# Altium PCB buck_conv.PcbDoc
Units mil, origin at the board's own origin, x right, y up, seen from the top; angles counter-clockwise.
Board outline 2370 x 1275 mil, 4 copper layers (Top Layer, MidLayer1, MidLayer2, Bottom Layer); 33 components, 22 nets, 92 pads, 277 vias.
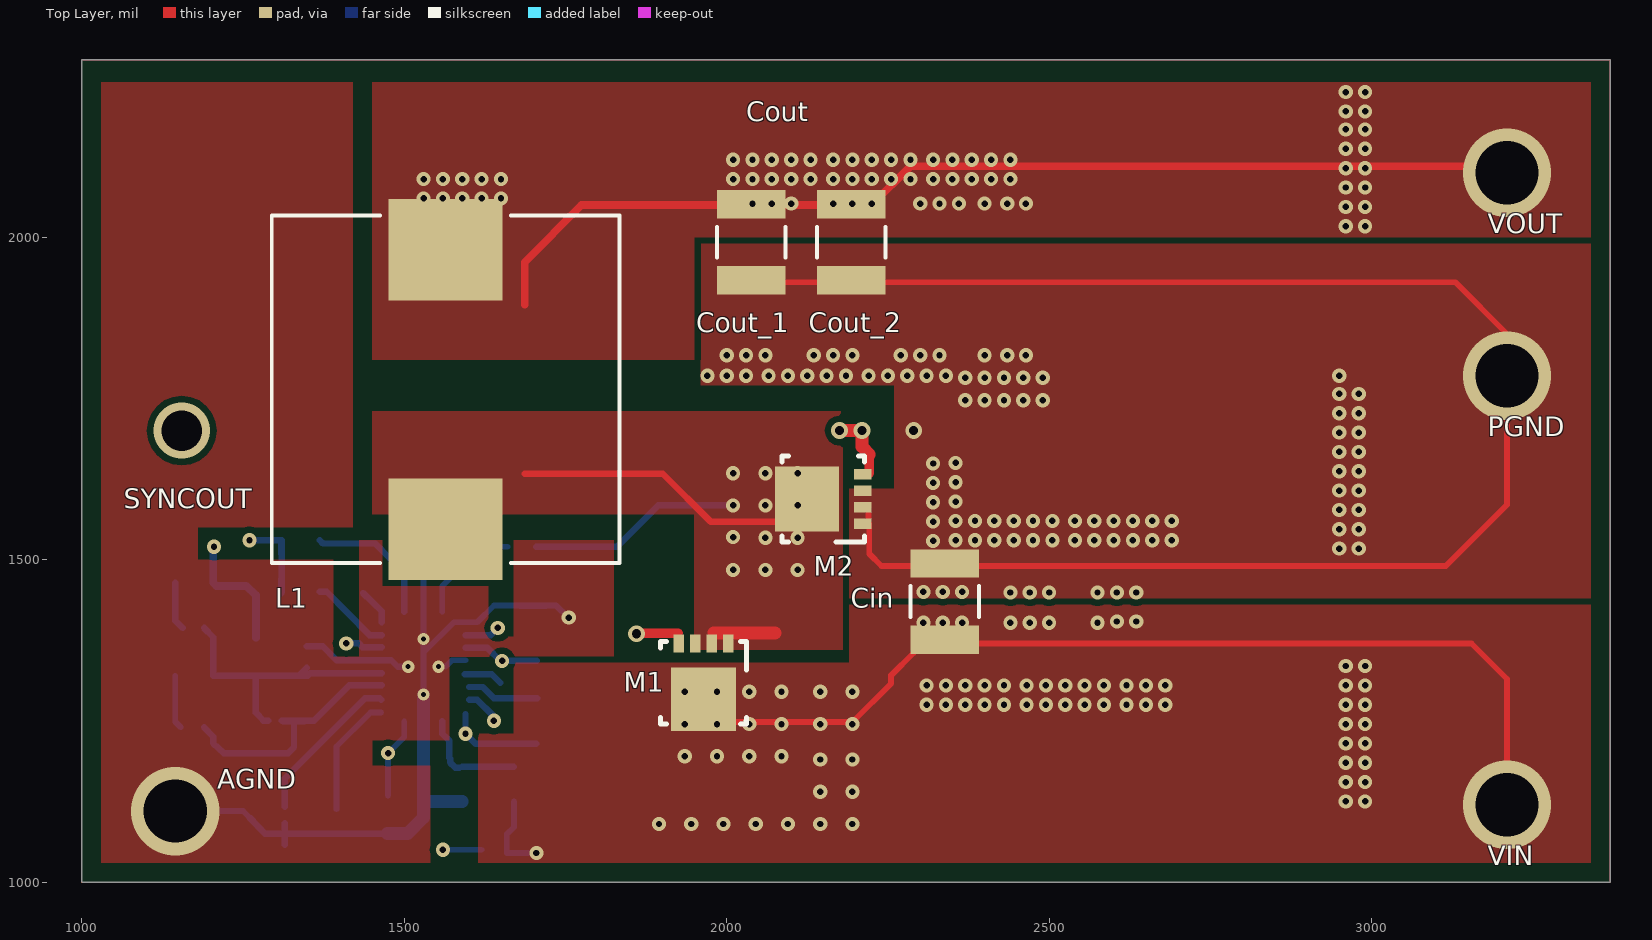
[diagram p0: Top Layer view]
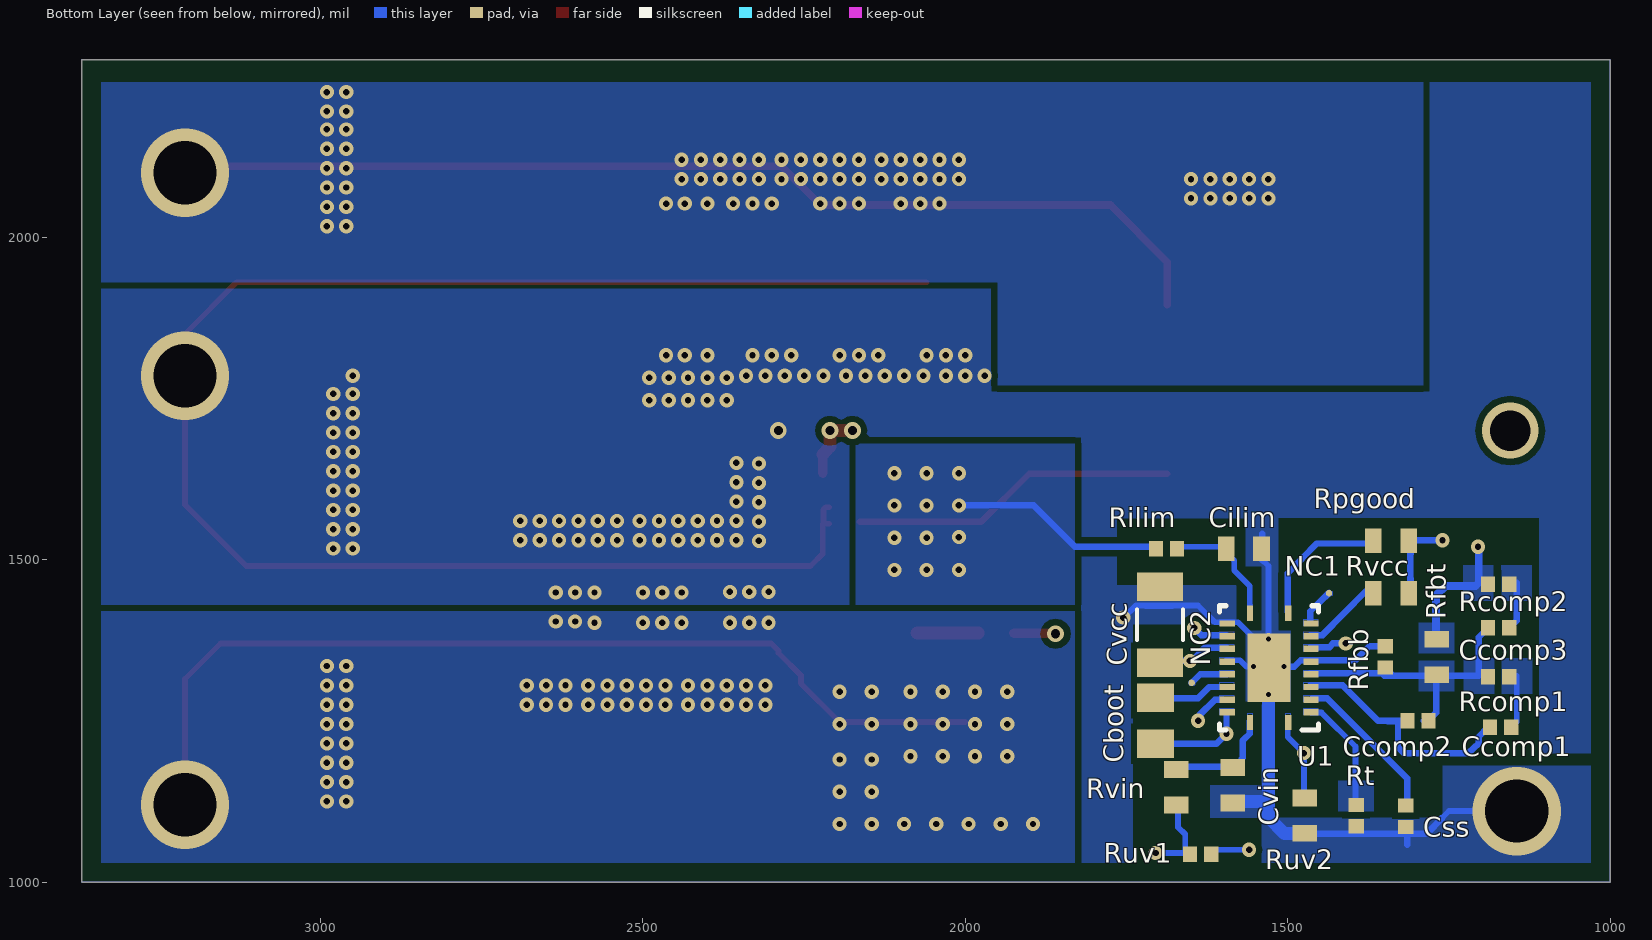
[diagram p1: Bottom Layer view, seen from below]
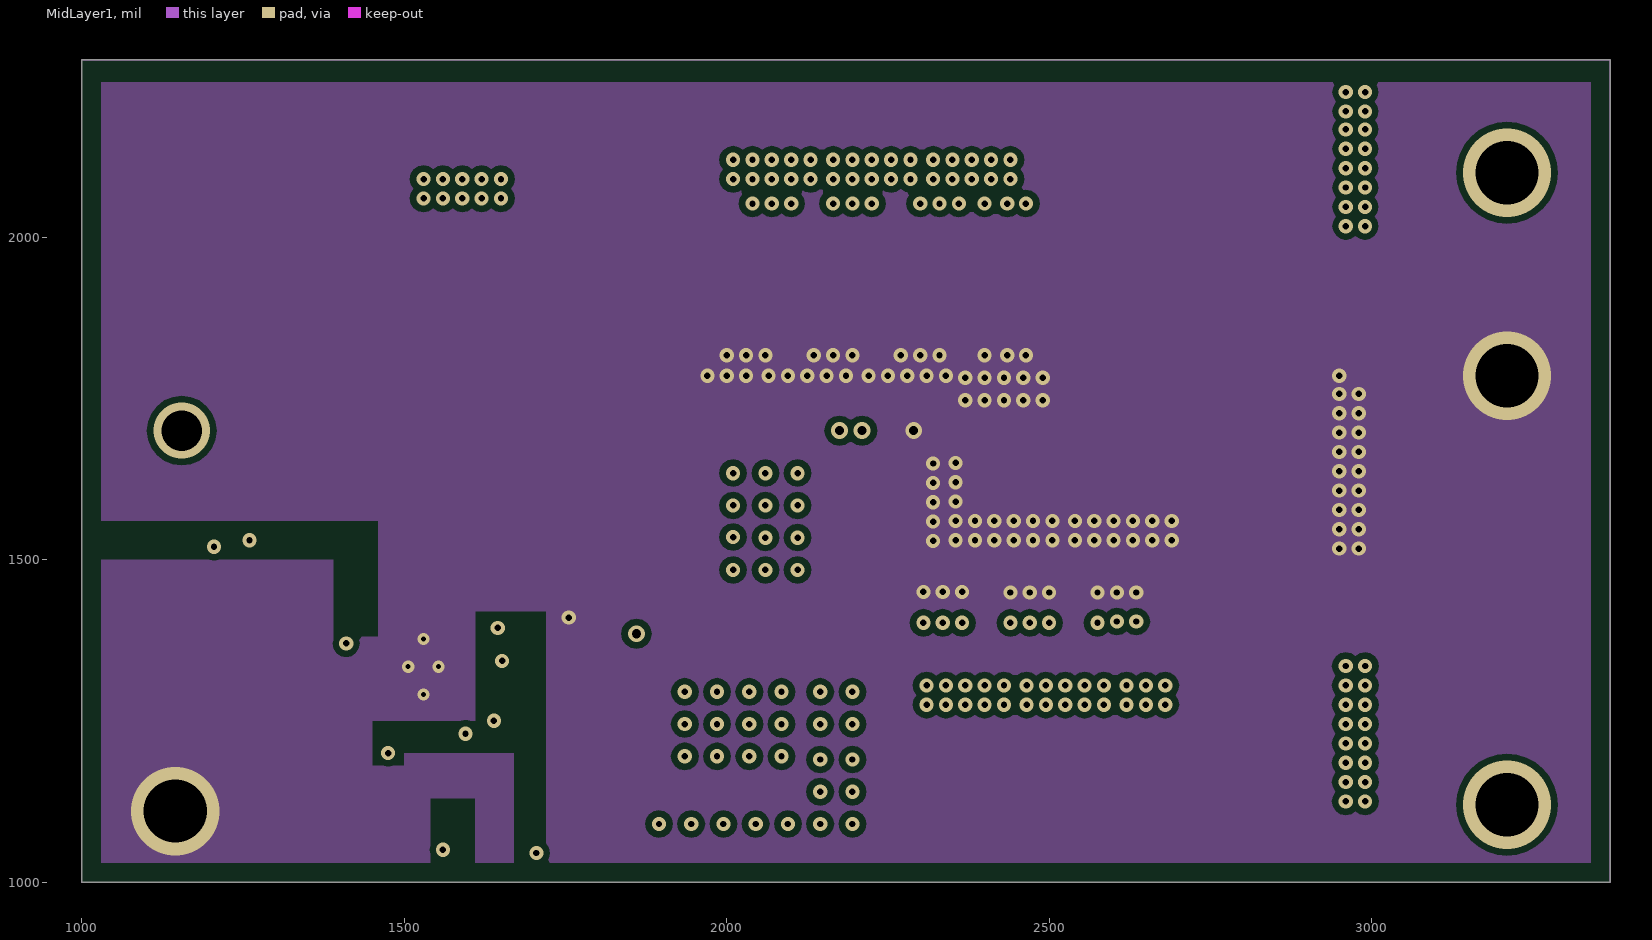
[diagram p2: MidLayer1]
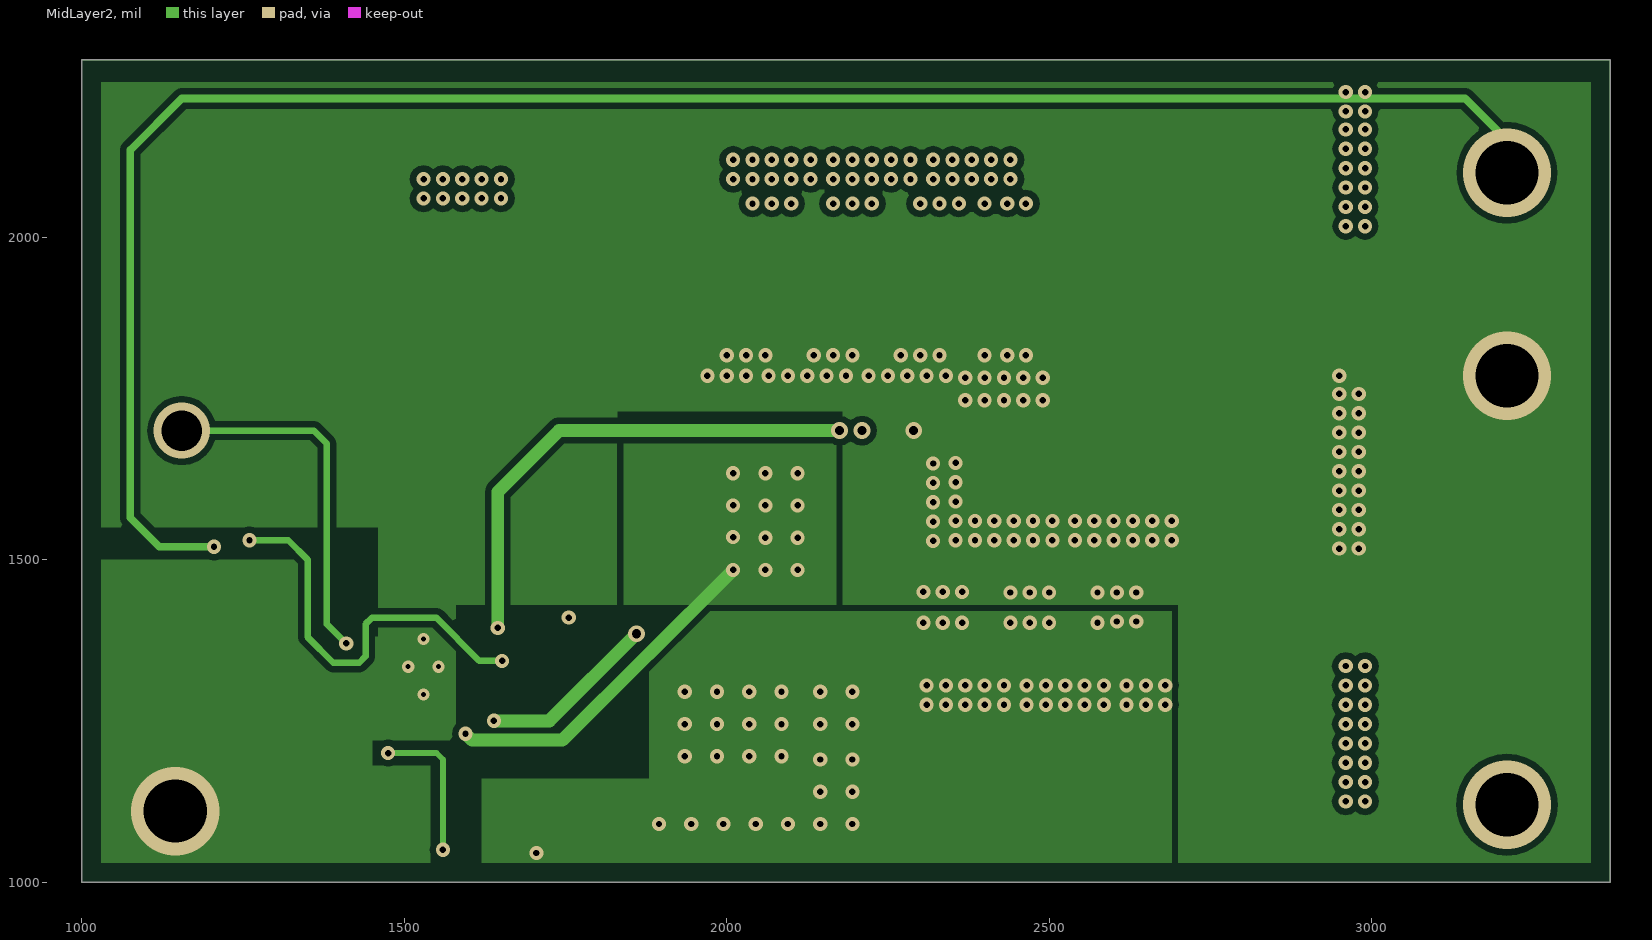
[diagram p3: MidLayer2]

## Layer stack, top to bottom
Top Solder: solder mask 0.4, Solder Resist, Dk 3.5
Top Layer: signal copper 1.4
Dielectric1: core 12.6, FR-4, Dk 4.8
MidLayer1: signal copper 1.4
Dielectric2: prepreg 12.6, FR-4, Dk 4.8
MidLayer2: signal copper 1.4
Dielectric3: core 12.6, FR-4, Dk 4.8
Bottom Layer: signal copper 1.4
Bottom Solder: solder mask 0.4, Solder Resist, Dk 3.5

## Board outline
1000,1000 3370,1000 3370,2275 1000,2275

## Design rules (kind name [scope] priority, off if disabled: settings)
Clearance [All] p1: gap=10 ignorepadtopadclearanceinfootprint=FALSE except(0: Arc-Hole Track-Hole SMDPad-Hole THPad-Hole Via-Hole Fill-Hole Poly-Hole Region-Hole Text-Hole)
PlaneConnect [All] p1: planeconnectstyle=Direct reliefexpansion=20 reliefentries=4 reliefconductorwidth=10 reliefairgap=10
PolygonConnect [All] p1: connectstyle=Direct reliefconductorwidth=10 reliefentries=4 polygonreliefangle="90 Angle" airgapwidth=10
RoutingVias [All] p1: holewidth=28 width=50 viastyle="Through Hole" minholewidth=28 minwidth=50 maxholewidth=28 maxwidth=50
SolderMaskExpansion [All] p1: expansion=4 istentingtop=FALSE
Width [All] p1: maxlimit=10 minlimit=10 preferedwidth=10
29 further rules are at their usual default settings.

## Components (designator, comment, footprint, x,y, rotation, side; value= is the part's Value field where it differs from the comment)
AGND "Comment" TP-1502 1144,1109 r0 top
Cboot "Comment" 0805 1705,1250 r90 bottom
Ccomp1 "Comment" 0402 1170,1240 r0 bottom
Ccomp2 "Comment" 0402 1298,1250 r0 bottom
Ccomp3 "Comment" 0402 1173,1394 r180 bottom
Cilim "Comment" 0603 1568,1517 r180 bottom
Cin "Comment" 1210 2338,1435 r90 top
Cout_1 "Comment" 1210 2038,1992 r270 top
Cout_2 "Comment" 1210 2193,1992 r270 top
Css "Comment" 0402 1317,1102 r90 bottom
Cvcc "Comment" 1206 1698,1399 r270 bottom
Cvin "Comment" 0603 1585,1150 r90 bottom
L1 "Comment" SRP1270 1564,1764 r270 top
M1 "Comment" DNH0008A 1964,1309 r270 top
M2 "Comment" DNH0008A 2150,1594 r180 top
NC1 "Comment" SMD_PAD1 1436,1448 r270 bottom
NC2 "Comment" SMD_PAD1 1649,1309 r270 bottom
PGND "Comment" TP-1502 3209,1785 r0 top
Rcomp1 "Comment" 0402 1173,1318 r180 bottom
Rcomp2 "Comment" 0402 1173,1462 r0 bottom
Rfbb "Comment" 0402 1349,1349 r90 bottom
Rfbt "Comment" 0603 1269,1349 r90 bottom
Rilim "Comment" 0402 1688,1517 r0 bottom
Rpgood "Comment" 0603 1340,1529 r180 bottom
Rt "Comment" 0402 1394,1103 r90 bottom
Ruv1 "Comment" 0402 1635,1043 r0 bottom
Ruv2 "Comment" 0603 1474,1103 r90 bottom
Rvcc "Comment" 0603 1340,1448 r0 bottom
Rvin "Comment" 0603 1673,1147 r270 bottom
SYNCOUT "Comment" TP-5012 1155,1699 r0 top
U1 "Comment" RGY0020B 1529,1332 r180 bottom
VIN "Comment" TP-1502 3209,1120 r0 top
VOUT "Comment" TP-1502 3209,2100 r0 top

## Footprints (in the part's own frame and the unit in brackets; to place one, negate y for a bottom-side part, rotate by r counter-clockwise, add the part's x,y. Pads: shape width x height; smd on the part's side, far side on the other; paste and mask are expansions set on the pad)
0402 [mil]
  rect 22x24 smd: 1(16.5,0) 2(-16.5,0)
0603 [mil]
  rect 26x38 smd: 1(27.5,0) 2(-27.5,0)
0805 [mil]
  rect 44x57 smd: 1(35.5,0) 2(-35.5,0)
1206 [mil]
  rect 44x71 smd: 1(59,0) 2(-59,0)
  silkscreen extent -24,-36 24,36
1210 [mil]
  rect 44x106 smd: 1(-59,0) 2(59,0)
  silkscreen extent -24,-53 24,53
DNH0008A [mm]
  rect 0.7x0.4 smd: 1(-1.55,0.975) 2(-1.55,0.325) 3(-1.55,-0.325) 4(-1.55,-0.975) 5(1.55,-0.975) 6(1.55,-0.325) 7(1.55,0.325) 8(1.55,0.975)
  rect 2.51x2.55 smd: 9(0.645,0)
  silkscreen extent -1.62,-1.7 1.62,1.7
RGY0020B [mm]
  rect 0.25x0.6 smd: 1(0.75,-2.15) 10(0.75,2.15) 11(-0.75,2.15) 20(-0.75,-2.15)
  rect 0.6x0.25 smd: 2(1.65,-1.75) 3(1.65,-1.25) 4(1.65,-0.75) 5(1.65,-0.25) 6(1.65,0.25) 7(1.65,0.75) 8(1.65,1.25) 9(1.65,1.75) 12(-1.65,1.75) 13(-1.65,1.25) 14(-1.65,0.75) 15(-1.65,0.25) 16(-1.65,-0.25) 17(-1.65,-0.75) 18(-1.65,-1.25) 19(-1.65,-1.75)
  rect 1.7x2.7 smd: 21(0,0)
  silkscreen extent -1.95,-2.45 1.95,2.45
SMD_PAD1 [mil]
  round 10 smd: 1(0,0)
SRP1270 [mil]
  rect 157.5x177 smd: 1(-216.75,0) 2(216.75,0)
  silkscreen extent -270,-270 270,270
TP-1502 [mil]
  round 65 hole 32 unplated: 1(0,0)
TP-5012 [mil]
  round 65 hole 32 unplated: 1(0,0)

## Via types
v1: diameter 22/22/22/22 (per signal layer), hole 10, Top Layer to Bottom Layer, tented both sides, 264 vias
v2: diameter 19/19/19/19 (per signal layer), hole 8, Top Layer to Bottom Layer, 4 vias
v3: diameter 26/26/26/26 (per signal layer), hole 14, Top Layer to Bottom Layer, 4 vias
v4: diameter 137/137/137/137 (per signal layer), hole 98, Top Layer to Bottom Layer, 4 vias
v5: diameter 87/87/87/87 (per signal layer), hole 63, Top Layer to Bottom Layer, 1 vias

## Nets (pads, with @x,y where several pads share a name; then routed paths per layer and width w, separated by ;. In a path a pad name is that pad's centre, name@x,y a point inside that pad or via, vN(x,y) a via of type N, cw(c..) or ccw(c..) an arc to the next point about the centre after c; other vN are vias at no path point)
0: AGND.1 Cilim.1 Cin.2 Cout_1.2 Cout_2.2 Css.2 Cvcc.2 Cvin.2 M2.1 M2.2 M2.3 PGND.1 Rfbb.1 Rt.2 Ruv2.2 U1.6 U1.12 U1.15 U1.21 | length 4102.3
  Top Layer w9: Cout_1.2@2060,1930 3130,1930 3210,1850 v4(3210,1785) 3210,1585 3115,1490 2240,1490 2221,1509 2221,1533.5 M2.1@2221,1555.61 ; M2.1 2216.63,1555.61 2220,1558.99 2220,1577.83 2216.63,1581.2 M2.2
  Bottom Layer w9: v4(1145,1110) 1250,1110 1260,1100 ; v2(1530,1291) U1.21@1530,1356 ; Cilim.1@1540,1520 1540,1500 1539.5,1499.5 1530,1490 v2(1530,1377) U1.21@1530,1356 ; v2(1553,1334) 1564,1334 1574,1344 U1.15@1595,1344 ; v1(1755,1410) 1735,1429 1639,1429 1613,1403 1577,1403 U1.21@1530,1356
  Bottom Layer w10: 1260,1100 1284,1075 Css.2@1314.5,1075 ; 1314.5,1058 Css.2@1314.5,1075 ; Css.2@1314.5,1091 Css.2@1314.5,1075 ; Rfbb.1 1373.5,1365.5 1395,1344 1480,1344 1490,1334 v2(1506,1334) ; 1454,1074.5 1495,1074.5 ; Ruv2.2@1474,1075 Css.2@1314.5,1075 ; Cilim.1@1539.5,1499 1539.5,1499.5 1539.5,1540 ; 1679,1428.5 1720,1428.5
  Bottom Layer w20: Ruv2.2@1474,1075 1505,1075 1530,1100 1530,1130 ; v2(1530,1291) 1530,1130 ; Cvin.2@1590,1125 1534,1125 1530,1130
  other v1: 2440,1449 2470,1449 2500,1449 2575,1449 2605,1449 2635,1449 2305,1450 2335,1450 2365,1450 2950,1517 2980,1517 2320,1529 2355,1530 2385,1530 2415,1530 2445,1530 2475,1530 2505,1530 2540,1530 2570,1530 2600,1530 2630,1530 2660,1530 2690,1530 2950,1547 2980,1547 2320,1559 2355,1560 2385,1560 2415,1560 2445,1560 2475,1560 2505,1560 2540,1560 2570,1560 2600,1560 2630,1560 2660,1560 2690,1560 2950,1577 2980,1577 2320,1589 2355,1590 2950,1607 2980,1607 2320,1619 2355,1620 2950,1637 2980,1637 2320,1649 2355,1650 2950,1667 2980,1667 2950,1697 2980,1697 2950,1727 2980,1727 2370,1747 2400,1747 2430,1747 2460,1747 2490,1747 2950,1757 2980,1757 2370,1782 2400,1782 2430,1782 2460,1782 2490,1782 1970,1785 2000,1785 2030,1785 2065,1785 2095,1785 2125,1785 2155,1785 2185,1785 2220,1785 2250,1785 2280,1785 2310,1785 2340,1785 2950,1785 2000,1817 2030,1817 2060,1817 2135,1817 2165,1817 2195,1817 2270,1817 2300,1817 2330,1817 2400,1817 2435,1817 2464,1817
  other v3: 2290,1700
1: Cvcc.1 Rpgood.1 Rvcc.2 U1.14 | length 918.5
  MidLayer2 w10: v1(1260,1530) 1320,1530 1350,1500 1350,1380 1390,1340 1430,1340 1440,1350 1440,1400 1450,1410 1550,1410 1616,1343 v1(1651.75,1343)
  Bottom Layer w10: v1(1260,1530) Rpgood.1@1309.5,1530 ; Rvcc.2@1309.5,1448 1309.5,1470 ; 1309.5,1509 Rpgood.1@1309.5,1530 ; Rvcc.2@1310,1450 1310,1530 Rpgood.1@1309.5,1530 ; U1.14@1595,1363 1629,1363 1649,1343 Cvcc.1@1705.17,1343
2: Cin.1 M1.5 M1.6 M1.7 M1.8 M1.9 Ruv1.1 Rvin.1 VIN.1 | length 1618.2
  Top Layer w9: M1.9@2000,1248 2035,1248 2085,1248 2145,1248 2195,1248 2255,1308 2255,1320.73 2289.5,1355.23 2289.5,1358.5 2301,1370 2960,1370 2990,1370 3155,1370 3210,1315 v4(3210,1120)
  Bottom Layer w9: Rvin.1@1670,1125 1670,1085 1659,1074 1659,1050 1659,1045 v1(1705,1045)
  other v1: 1895,1090 1945,1090 1995,1090 2045,1090 2095,1090 2145,1090 2195,1090 2960,1125 2990,1125 2145,1140 2195,1140 2960,1155 2990,1155 2960,1185 2990,1185 2145,1190 2195,1190 1935,1195 1985,1195 2035,1195 2085,1195 2960,1215 2990,1215 1935,1245 1985,1245 2035,1245 2085,1245 2145,1245 2195,1245 2960,1245 2990,1245 2310,1275 2340,1275 2370,1275 2400,1275 2430,1275 2465,1275 2495,1275 2525,1275 2555,1275 2585,1275 2620,1275 2650,1275 2680,1275 2960,1275 2990,1275 1935,1295 1985,1295 2035,1295 2085,1295 2145,1295 2195,1295 2310,1305 2340,1305 2370,1305 2400,1305 2430,1305 2465,1305 2495,1305 2525,1305 2555,1305 2585,1305 2620,1305 2650,1305 2680,1305 2960,1305 2990,1305 2960,1335 2990,1335 2305,1402 2335,1402 2365,1402 2440,1402 2470,1402 2500,1402 2575,1402 2605,1404 2635,1404
3: Ruv1.2 Ruv2.1 U1.1 | length 419.5
  MidLayer2 w9: v1(1475,1200) 1550,1200 1560,1190 v1(1560,1050) v1@1560,1045
  Bottom Layer w9: Ruv2.1@1475,1134 v1(1475,1200) 1500,1225 U1.1@1500,1249 ; v1(1560,1050) 1600,1050 Ruv1.2@1620,1050
6: Cvin.1 Rvin.2 U1.20 | length 165.9
  Bottom Layer w10: U1.20@1559,1249 1559,1230 1566.95,1222.3 1570,1219.26 1570,1192.5 1571,1191.5 1571,1185.5 1579,1177.5 Cvin.1 ; Cvin.1@1590,1179 Rvin.2@1670,1179
7: Cout_1.1 Cout_2.1 L1.1 Rcomp2.1 Rfbt.1 VOUT.1 | length 4873.4
  Top Layer w12: 1687,1895 1687,1961 1775,2050 2060,2050 2165,2050 2225,2050 2285,2110 2350,2110 2410,2110 3200,2110 v4(3210,2100)
  MidLayer2 w12: v1(1205,1520) 1120,1520 1075,1565 1075,2135 1155,2215 3145,2215 3210,2150 v4(3210,2100) v4@3210,2040
  Bottom Layer w12: v1@1204,1519 1204,1464 1209,1459 1255,1459 1270,1445 Rfbt.1@1270,1379
  other v1: 2960,2017 2990,2017 2960,2047 2990,2047 2040,2052 2070,2052 2100,2052 2165,2052 2195,2052 2225,2052 2300,2052 2330,2052 2360,2052 2400,2052 2435,2052 2464,2052 1530,2060 1560,2060 1590,2060 1620,2060 1650,2060 2960,2077 2990,2077 1530,2090 1560,2090 1590,2090 1620,2090 1650,2090 2010,2090 2040,2090 2070,2090 2100,2090 2130,2090 2165,2090 2195,2090 2225,2090 2255,2090 2285,2090 2320,2090 2350,2090 2380,2090 2410,2090 2440,2090 2960,2107 2990,2107 2010,2120 2040,2120 2070,2120 2100,2120 2130,2120 2165,2120 2195,2120 2225,2120 2255,2120 2285,2120 2320,2120 2350,2120 2380,2120 2410,2120 2440,2120 2960,2137 2990,2137 2960,2167 2990,2167 2960,2195 2990,2195 2960,2225 2990,2225
8: Ccomp1.1 Ccomp2.1 U1.4 | length 417.4
  Bottom Layer w10: Ccomp1.1@1189.5,1240 1204,1225.5 1204,1215 1220,1200 1320,1200 1329,1209 1329,1249.5 ; Ccomp2.1@1310,1250 Ccomp2.1 1329,1250 ; Ccomp2.1@1312,1249.5 1329,1249.5 ; 1345,1249.5 1329,1249.5 ; U1.4@1465,1305 1415,1305 1360,1250 1345,1250 1329,1250 ; 1329,1249.5 1329,1250
9: Ccomp2.2 Ccomp3.2 Rcomp1.2 Rfbb.2 Rfbt.2 U1.5 | length 450.3
  Bottom Layer w10: Ccomp3.2 1204,1379.5 1204,1320 Rfbt.2@1270,1320 ; Ccomp2.2@1289,1250 Ccomp2.2 1281.5,1251 1270,1262.5 Rfbt.2@1270,1320 ; 1329,1319.5 1336,1319.5 1336.5,1320 ; Rfbb.2 1336.5,1320 ; U1.5@1465,1324 1354,1324 1350,1320 1336.5,1320 ; Rfbt.2@1270,1320 1336.5,1320
11: Cilim.2 Rilim.2 U1.11 | length 178.6
  Bottom Layer w9: U1.11@1559,1419 1559,1459 1583.04,1483.04 1583.04,1498.54 1599,1514.5 1599,1520 1660,1520
14: Cboot.2 L1.2 M1.1 M1.2 M1.3 M2.5 M2.6 M2.7 M2.8 M2.9 Rilim.1 U1.19 | length 1696.3
  Top Layer w10: 1687,1633 1901,1633 1975,1559 M2.9@2083,1559 ; 2001,1558.5 M2.9@2164,1558.5
  Top Layer w20: 1980,1386 2024.5,1386 2075,1386
  MidLayer2 w20: v1(1595,1230) 1605,1220 1745,1220 v1(2010,1484)
  Bottom Layer w10: U1.19@1595,1260 v1(1595,1230) 1610.5,1214.5 Cboot.2 ; Rilim.1@1704.5,1520 1830,1520 1894,1584 v1(2010,1584) v1@2015,1584
  other v1: 2060,1484 2110,1484 2060,1534 2110,1534 2010,1535 2060,1584 2110,1584 2010,1634 2060,1634 2110,1634
18: Ccomp1.2 Rcomp1.1 | length 83.5
  Bottom Layer w9: 1145,1320 1145,1248.5 Ccomp1.2
19: Ccomp3.1 Rcomp2.2 | length 74.8
  Bottom Layer w10: 1145,1464 1145,1405.5 Ccomp3.1
20: Rvcc.1 U1.8 | length 124
  Bottom Layer w10: Rvcc.1@1369,1450 1380,1450 1446,1383 U1.8@1465,1383
22: NC2.1 U1.16 | length 60.5
  Bottom Layer w10: U1.16 1635.84,1322.16 NC2.1
23: NC1.1 U1.9 | length 57.3
  Bottom Layer w10: NC1.1 1465,1420 U1.9@1465,1403
27: Rt.1 U1.2 | length 188
  Bottom Layer w9: Rt.1@1395,1113 1395,1134 1395,1210 1447.68,1262.68 1463.62,1262.68 U1.2
28: Cboot.1 U1.17 | length 113
  Bottom Layer w10: U1.17@1600.77,1302.47 1621.53,1302.47 1639,1285 Cboot.1@1706.5,1285
30: Css.1 U1.3 | length 261.3
  Bottom Layer w10: Css.1@1314.5,1117 1314.5,1150 ; 1315,1134 1315,1161 1439,1285 1461.83,1285 U1.3
36: M1.4 U1.18 | length 398.1
  Top Layer w15: v3@1861,1386 1925,1386
  Top Layer w20: v3(1860,1385) v3@1861,1386
  MidLayer2 w20: v1(1639,1250) 1725,1250 v3(1860,1385)
  Bottom Layer w10: U1.18@1600.77,1282.79 1612.93,1282.79 1636.7,1259.01 1636.7,1252.3 v1(1639,1250)
37: M2.4 U1.13 | length 940.2
  Top Layer w15: M2.4@2221,1634 2221,1663
  Top Layer w20: v3(2175,1700) v3(2210,1700) 2210,1675 2221,1663
  MidLayer2 w20: v1(1645,1394) 1645,1605 1740,1700 v3(2175,1700)
  Bottom Layer w10: U1.13@1595,1383 1634,1383 v1(1645,1394)
38: SYNCOUT.1 U1.7 | length 623.5
  MidLayer2 w10: SYNCOUT.1@1145,1700 v5(1155,1700) 1360,1700 1380,1680 1380,1400 v1(1410,1370)
  Bottom Layer w10: v1(1410,1370) 1430,1370 1435,1364 U1.7@1465,1364
39: Rpgood.2 U1.10 | length 212.4
  Bottom Layer w10: Rpgood.2@1369,1530 1374,1525 1455,1525 1500,1479 U1.10@1500,1419

## Polygon pours and split planes (outlines as drawn)
no net on Top Solder "Top Layer-No Net" (solid, remove dead copper): 2172.05,1640.13 2172.05,1547.87 2172.01,1547.46 2171.89,1547.07 2171.69,1546.7 2171.43,1546.39 2171.12,1546.12 2170.75,1545.93 2170.36,1545.81 2169.95,1545.77 2104.26,1545.77 2103.85,1545.81 2103.46,1545.93 2103.1,1546.12 2102.78,1546.39 2102.52,1546.7 2102.32,1547.07 2102.21,1547.46 2102.17,1547.87 2102.17,1640.13 2102.21,1640.54 2102.32,1640.93 2102.52,1641.3 2102.78,1641.61 2103.1,1641.88 2103.46,1642.07 2103.85,1642.19 2104.26,1642.23 2169.95,1642.23 2170.36,1642.19 2170.75,1642.07 2171.12,1641.88 2171.43,1641.61 2171.69,1641.3 2171.89,1640.93 2172.01,1640.54
no net on Top Solder "Top Layer-No Net" (solid, remove dead copper): 2113.58,1587.11 2093.9,1587.11 2093.9,1575.3 2113.58,1575.3
no net on Top Solder "Top Layer-No Net" (solid, remove dead copper): 2113.58,1612.7 2093.9,1612.7 2093.9,1600.89 2113.58,1600.89
no net on Top Solder "Top Layer-No Net" (solid, remove dead copper): 2113.58,1638.29 2093.9,1638.29 2093.9,1626.48 2113.58,1626.48
no net on Top Solder "Top Layer-No Net" (solid, remove dead copper): 2113.58,1561.52 2093.9,1561.52 2093.9,1549.71 2113.58,1549.71
no net on Top Solder "Top Layer-No Net" (solid, remove dead copper): 1917.87,1331.05 2010.13,1331.05 2010.54,1331.01 2010.93,1330.89 2011.3,1330.69 2011.61,1330.43 2011.88,1330.12 2012.07,1329.75 2012.19,1329.36 2012.23,1328.95 2012.23,1263.26 2012.19,1262.85 2012.07,1262.46 2011.88,1262.1 2011.61,1261.78 2011.3,1261.52 2010.93,1261.32 2010.54,1261.21 2010.13,1261.17 1917.87,1261.17 1917.46,1261.21 1917.07,1261.32 1916.7,1261.52 1916.39,1261.78 1916.12,1262.1 1915.93,1262.46 1915.81,1262.85 1915.77,1263.26 1915.77,1328.95 1915.81,1329.36 1915.93,1329.75 1916.12,1330.12 1916.39,1330.43 1916.7,1330.69 1917.07,1330.89 1917.46,1331.01
no net on Top Solder "Top Layer-No Net" (solid, remove dead copper): 1970.89,1272.58 1970.89,1252.9 1982.7,1252.9 1982.7,1272.58
no net on Top Solder "Top Layer-No Net" (solid, remove dead copper): 1945.3,1272.58 1945.3,1252.9 1957.11,1252.9 1957.11,1272.58
no net on Top Solder "Top Layer-No Net" (solid, remove dead copper): 1919.71,1272.58 1919.71,1252.9 1931.52,1252.9 1931.52,1272.58
no net on Top Solder "Top Layer-No Net" (solid, remove dead copper): 1996.48,1272.58 1996.48,1252.9 2008.29,1252.9 2008.29,1272.58
no net on Top Paste "Top Layer-No Net" (solid, remove dead copper): 2136.42,1588.12 2136.42,1547.71 2136.38,1547.34 2136.27,1546.97 2136.09,1546.64 2135.85,1546.34 2135.55,1546.1 2135.22,1545.92 2134.85,1545.81 2134.47,1545.77 2110.6,1545.77 2110.23,1545.81 2109.86,1545.92 2109.52,1546.1 2109.23,1546.34 2108.99,1546.64 2108.81,1546.97 2108.7,1547.34 2108.66,1547.71 2108.66,1588.12 2108.7,1588.5 2108.81,1588.86 2108.99,1589.2 2109.23,1589.49 2109.52,1589.74 2109.86,1589.92 2110.23,1590.03 2110.6,1590.06 2134.47,1590.06 2134.85,1590.03 2135.22,1589.92 2135.55,1589.74 2135.85,1589.49 2136.09,1589.2 2136.27,1588.86 2136.38,1588.5
no net on Top Paste "Top Layer-No Net" (solid, remove dead copper): 2136.42,1640.29 2136.42,1599.88 2136.38,1599.5 2136.27,1599.14 2136.09,1598.8 2135.85,1598.51 2135.55,1598.26 2135.22,1598.08 2134.85,1597.97 2134.47,1597.94 2110.6,1597.94 2110.23,1597.97 2109.86,1598.08 2109.52,1598.26 2109.23,1598.51 2108.99,1598.8 2108.81,1599.14 2108.7,1599.5 2108.66,1599.88 2108.66,1640.29 2108.7,1640.66 2108.81,1641.03 2108.99,1641.36 2109.23,1641.66 2109.52,1641.9 2109.86,1642.08 2110.23,1642.19 2110.6,1642.23 2134.47,1642.23 2134.85,1642.19 2135.22,1642.08 2135.55,1641.9 2135.85,1641.66 2136.09,1641.36 2136.27,1641.03 2136.38,1640.66
no net on Top Paste "Top Layer-No Net" (solid, remove dead copper): 2144.29,1599.88 2144.29,1640.29 2144.33,1640.66 2144.44,1641.03 2144.62,1641.36 2144.86,1641.66 2145.15,1641.9 2145.49,1642.08 2145.86,1642.19 2146.23,1642.23 2170.1,1642.23 2170.48,1642.19 2170.85,1642.08 2171.18,1641.9 2171.48,1641.66 2171.72,1641.36 2171.9,1641.03 2172.01,1640.66 2172.05,1640.29 2172.05,1599.88 2172.01,1599.5 2171.9,1599.14 2171.72,1598.8 2171.48,1598.51 2171.18,1598.26 2170.85,1598.08 2170.48,1597.97 2170.1,1597.94 2146.23,1597.94 2145.86,1597.97 2145.49,1598.08 2145.15,1598.26 2144.86,1598.51 2144.62,1598.8 2144.44,1599.14 2144.33,1599.5
no net on Top Paste "Top Layer-No Net" (solid, remove dead copper): 2144.29,1547.71 2144.29,1588.12 2144.33,1588.5 2144.44,1588.86 2144.62,1589.2 2144.86,1589.49 2145.15,1589.74 2145.49,1589.92 2145.86,1590.03 2146.23,1590.06 2170.1,1590.06 2170.48,1590.03 2170.85,1589.92 2171.18,1589.74 2171.48,1589.49 2171.72,1589.2 2171.9,1588.86 2172.01,1588.5 2172.05,1588.12 2172.05,1547.71 2172.01,1547.34 2171.9,1546.97 2171.72,1546.64 2171.48,1546.34 2171.18,1546.1 2170.85,1545.92 2170.48,1545.81 2170.1,1545.77 2146.23,1545.77 2145.86,1545.81 2145.49,1545.92 2145.15,1546.1 2144.86,1546.34 2144.62,1546.64 2144.44,1546.97 2144.33,1547.34
no net on Top Paste "Top Layer-No Net" (solid, remove dead copper): 1969.88,1295.42 2010.29,1295.42 2010.66,1295.38 2011.03,1295.27 2011.36,1295.09 2011.66,1294.85 2011.9,1294.55 2012.08,1294.22 2012.19,1293.85 2012.23,1293.47 2012.23,1269.6 2012.19,1269.23 2012.08,1268.86 2011.9,1268.52 2011.66,1268.23 2011.36,1267.99 2011.03,1267.81 2010.66,1267.7 2010.29,1267.66 1969.88,1267.66 1969.5,1267.7 1969.14,1267.81 1968.8,1267.99 1968.51,1268.23 1968.26,1268.52 1968.08,1268.86 1967.97,1269.23 1967.94,1269.6 1967.94,1293.47 1967.97,1293.85 1968.08,1294.22 1968.26,1294.55 1968.51,1294.85 1968.8,1295.09 1969.14,1295.27 1969.5,1295.38
no net on Top Paste "Top Layer-No Net" (solid, remove dead copper): 1917.71,1295.42 1958.12,1295.42 1958.5,1295.38 1958.86,1295.27 1959.2,1295.09 1959.49,1294.85 1959.74,1294.55 1959.92,1294.22 1960.03,1293.85 1960.06,1293.47 1960.06,1269.6 1960.03,1269.23 1959.92,1268.86 1959.74,1268.52 1959.49,1268.23 1959.2,1267.99 1958.86,1267.81 1958.5,1267.7 1958.12,1267.66 1917.71,1267.66 1917.34,1267.7 1916.97,1267.81 1916.64,1267.99 1916.34,1268.23 1916.1,1268.52 1915.92,1268.86 1915.81,1269.23 1915.77,1269.6 1915.77,1293.47 1915.81,1293.85 1915.92,1294.22 1916.1,1294.55 1916.34,1294.85 1916.64,1295.09 1916.97,1295.27 1917.34,1295.38
no net on Top Paste "Top Layer-No Net" (solid, remove dead copper): 1958.12,1303.29 1917.71,1303.29 1917.34,1303.33 1916.97,1303.44 1916.64,1303.62 1916.34,1303.86 1916.1,1304.15 1915.92,1304.49 1915.81,1304.86 1915.77,1305.23 1915.77,1329.1 1915.81,1329.48 1915.92,1329.85 1916.1,1330.18 1916.34,1330.48 1916.64,1330.72 1916.97,1330.9 1917.34,1331.01 1917.71,1331.05 1958.12,1331.05 1958.5,1331.01 1958.86,1330.9 1959.2,1330.72 1959.49,1330.48 1959.74,1330.18 1959.92,1329.85 1960.03,1329.48 1960.06,1329.1 1960.06,1305.23 1960.03,1304.86 1959.92,1304.49 1959.74,1304.15 1959.49,1303.86 1959.2,1303.62 1958.86,1303.44 1958.5,1303.33
no net on Top Paste "Top Layer-No Net" (solid, remove dead copper): 2010.29,1303.29 1969.88,1303.29 1969.5,1303.33 1969.14,1303.44 1968.8,1303.62 1968.51,1303.86 1968.26,1304.15 1968.08,1304.49 1967.97,1304.86 1967.94,1305.23 1967.94,1329.1 1967.97,1329.48 1968.08,1329.85 1968.26,1330.18 1968.51,1330.48 1968.8,1330.72 1969.14,1330.9 1969.5,1331.01 1969.88,1331.05 2010.29,1331.05 2010.66,1331.01 2011.03,1330.9 2011.36,1330.72 2011.66,1330.48 2011.9,1330.18 2012.08,1329.85 2012.19,1329.48 2012.23,1329.1 2012.23,1305.23 2012.19,1304.86 2012.08,1304.49 2011.9,1304.15 2011.66,1303.86 2011.36,1303.62 2011.03,1303.44 2010.66,1303.33
14 on MidLayer2 "Top Layer-No Net" (solid, pour order 26): 1840,1680 2170,1680 2170,1430 1840,1430
2 on MidLayer2 "Top Layer-No Net" (solid, pour order 27): 2690,1030 1620,1030 1620,1160 1880,1160 1880,1420 2690,1420
0 on MidLayer2 "Top Layer-No Net" (solid, pour order 38): 1030,2240 3340,2240 3340,1030 2700,1030 2700,1430 2180,1430 2180,1730 1830,1730 1830,1430 1580,1430 1580,1220 1450,1220 1450,1180 1540,1180 1540,1030 1030,1030 1030,1500 1370,1500 1370,1380 1460,1380 1460,1550 1030,1550
no net on Bottom Paste "Top Layer-No Net" (solid, remove dead copper): 1498.51,1281.29 1559.49,1281.29 1559.49,1328.06 1498.51,1328.06
no net on Bottom Paste "Top Layer-No Net" (solid, remove dead copper): 1498.51,1335.94 1559.49,1335.94 1559.49,1382.71 1498.51,1382.71
0 on Top Layer "Top Layer-No Net" (solid, pour order 41): 1030,2240 1420,2240 1420,1550 1180,1550 1180,1500 1280,1500 1390,1500 1390,1349 1430,1349 1430,1530 1630,1530 1630,1380 1670,1380 1670,1530 1825,1530 1825,1349 1570,1349 1570,1220 1450,1220 1450,1180 1540,1180 1540,1030 1030,1030
7 on Top Layer "Top Layer-No Net" (solid, pour order 31): 1450,2240 3340,2240 3340,2000 1950,2000 1950,1810 1450,1810
2 on Top Layer "Top Layer-No Net" (solid, pour order 32): 3340,1030 1615,1030 1615,1230 1670,1230 1670,1340 2190,1340 2190,1430 3340,1430
14 on Top Layer "Top Layer-No Net" (solid, pour order 33): 2180,1360 2180,1730 1450,1730 1450,1570 1950,1570 1950,1360
0 on Top Layer "Top Layer-No Net" (solid, pour order 42): 1960,1990 1960,1770 2260,1770 2260,1610 2190,1610 2190,1440 3340,1440 3340,1990
9 on Bottom Layer "Top Layer-No Net" (solid, pour order 22): 1180,1292 1180,1347 1227,1347 1227,1292
18 on Bottom Layer "Top Layer-No Net" (solid, pour order 21): 1121,1292 1121,1347 1168,1347 1168,1292
1 on Bottom Layer "Top Layer-No Net" (solid, pour order 0): 1583,1359 1583,1368 1606,1368 1606,1359
37 on Bottom Layer "Top Layer-No Net" (solid, pour order 1): 1583,1378 1583,1387 1606,1387 1606,1378
11 on Bottom Layer "Top Layer-No Net" (solid, pour order 2): 1554,1407 1554,1430 1563,1430 1563,1407
28 on Bottom Layer "Top Layer-No Net" (solid, pour order 3): 1583,1300 1583,1309 1606,1309 1606,1300
36 on Bottom Layer "Top Layer-No Net" (solid, pour order 4): 1583,1280 1583,1289 1606,1289 1606,1280
22 on Bottom Layer "Top Layer-No Net" (solid, pour order 5): 1583,1319 1583,1328 1606,1328 1606,1319
14 on Bottom Layer "Top Layer-No Net" (solid, pour order 6): 1583,1260 1583,1269 1606,1269 1606,1260
6 on Bottom Layer "Top Layer-No Net" (solid, pour order 7): 1554,1238 1554,1261 1563,1261 1563,1238
39 on Bottom Layer "Top Layer-No Net" (solid, pour order 8): 1495,1407 1495,1430 1504,1430 1504,1407
23 on Bottom Layer "Top Layer-No Net" (solid, pour order 9): 1453,1398 1453,1407 1476,1407 1476,1398
20 on Bottom Layer "Top Layer-No Net" (solid, pour order 10): 1453,1378 1453,1387 1476,1387 1476,1378
9 on Bottom Layer "Top Layer-No Net" (solid, pour order 11): 1453,1319 1453,1328 1476,1328 1476,1319
38 on Bottom Layer "Top Layer-No Net" (solid, pour order 12): 1453,1359 1453,1368 1476,1368 1476,1359
8 on Bottom Layer "Top Layer-No Net" (solid, pour order 13): 1453,1300 1453,1309 1476,1309 1476,1300
3 on Bottom Layer "Top Layer-No Net" (solid, pour order 14): 1495,1238 1495,1261 1504,1261 1504,1238
30 on Bottom Layer "Top Layer-No Net" (solid, pour order 15): 1453,1280 1453,1289 1476,1289 1476,1280
27 on Bottom Layer "Top Layer-No Net" (solid, pour order 16): 1453,1260 1453,1269 1476,1269 1476,1260
7 on Bottom Layer "Top Layer-No Net" (solid, pour order 17): 1181,1436 1181,1491 1228,1491 1228,1436
19 on Bottom Layer "Top Layer-No Net" (solid, pour order 18): 1122,1436 1122,1491 1169,1491 1169,1436
9 on Bottom Layer "Top Layer-No Net" (solid, pour order 19): 1242,1296 1242,1343 1297,1343 1297,1296
7 on Bottom Layer "Top Layer-No Net" (solid, pour order 20): 1242,1355 1242,1402 1297,1402 1297,1355
27 on Bottom Layer "Top Layer-No Net" (solid, pour order 23): 1367,1110 1367,1157 1422,1157 1422,1110
23 on Bottom Layer "Top Layer-No Net" (solid, pour order 24): 1441,1448 1440,1448 1440,1449 1440,1450 1439,1451 1438,1452 1437,1452 1436,1452 1436,1453 1435,1452 1434,1452 1433,1452 1432,1451 1431,1450 1431,1449 1431,1448 1431,1447 1431,1446 1431,1445 1432,1444 1433,1443 1434,1443 1435,1443 1436,1443 1437,1443 1438,1443 1439,1444 1440,1445 1440,1446 1440,1447 1441,1448
22 on Bottom Layer "Top Layer-No Net" (solid, pour order 25): 1654,1309 1653,1309 1653,1310 1653,1311 1652,1312 1651,1313 1650,1313 1649,1313 1649,1314 1648,1313 1647,1313 1646,1313 1645,1312 1644,1311 1644,1310 1644,1309 1644,1308 1644,1307 1644,1306 1645,1305 1646,1304 1647,1304 1648,1304 1649,1304 1650,1304 1651,1304 1652,1305 1653,1306 1653,1307 1653,1308 1654,1309
2 on Bottom Layer "Top Layer-No Net" (solid, pour order 28): 3340,1030 1830,1030 1830,1420 3340,1420
14 on Bottom Layer "Top Layer-No Net" (solid, pour order 29): 1830,1680 2170,1680 2170,1430 1830,1430
7 on Bottom Layer "Top Layer-No Net" (solid, pour order 30): 1950,1770 1290,1770 1290,2240 3340,2240 3340,1930 1950,1930
0 on Bottom Layer "Top Layer-No Net" (solid, pour order 34): 1583,1398 1583,1407 1606,1407 1606,1398
0 on Bottom Layer "Top Layer-No Net" (solid, pour order 35): 1583,1339 1583,1348 1606,1348 1606,1339
0 on Bottom Layer "Top Layer-No Net" (solid, pour order 36): 1453,1339 1453,1348 1476,1348 1476,1339
0 on Bottom Layer "Top Layer-No Net" (solid, pour order 39): 1820,1030 1740,1030 1740,1400 1620,1400 1580,1400 1580,1460 1765,1460 1765,1564 1565,1564 1565,1490 1540,1490 1540,1390 1565,1390 1565,1280 1495,1280 1495,1390 1515,1390 1515,1565 1110,1565 1110,1200 1030,1200 1030,2240 1280,2240 1280,1760 1960,1760 1960,1920 3340,1920 3340,1430 2180,1430 2180,1690 1820,1690
0 on Bottom Layer "Top Layer-No Net" (solid, pour order 40): 1520,1100 1520,1275 1540,1275 1540,1150 1620,1150 1620,1100 1540,1100 1540,1030 1030,1030 1030,1180 1260,1180 1260,1100
0 on MidLayer1 "Top Layer-No Net" (solid, pour order 37): 3050,1030 1720,1030 1720,1420 1610,1420 1610,1250 1450,1250 1450,1180 1500,1180 1500,1200 1670,1200 1670,1030 1610,1030 1610,1130 1540,1130 1540,1030 1030,1030 1030,1500 1390,1500 1390,1380 1460,1380 1460,1560 1030,1560 1030,2240 3340,2240 3340,1030

## Other copper
Multi-Layer:
  the board outline again, w1

## Silkscreen, mask and mechanical layers (free items; w line width, h text height)
Top Overlay:
  text "Cout" at 2030.02,2180 h30